# Altium PCB loadcell.PcbDoc
Units mm, origin at the board's own origin, x right, y up, seen from the top; angles counter-clockwise.
Board outline 108.33 x 80.65 mm, 2 copper layers (Top Layer, Bottom Layer); 10 components, 14 nets, 67 pads, 0 vias.
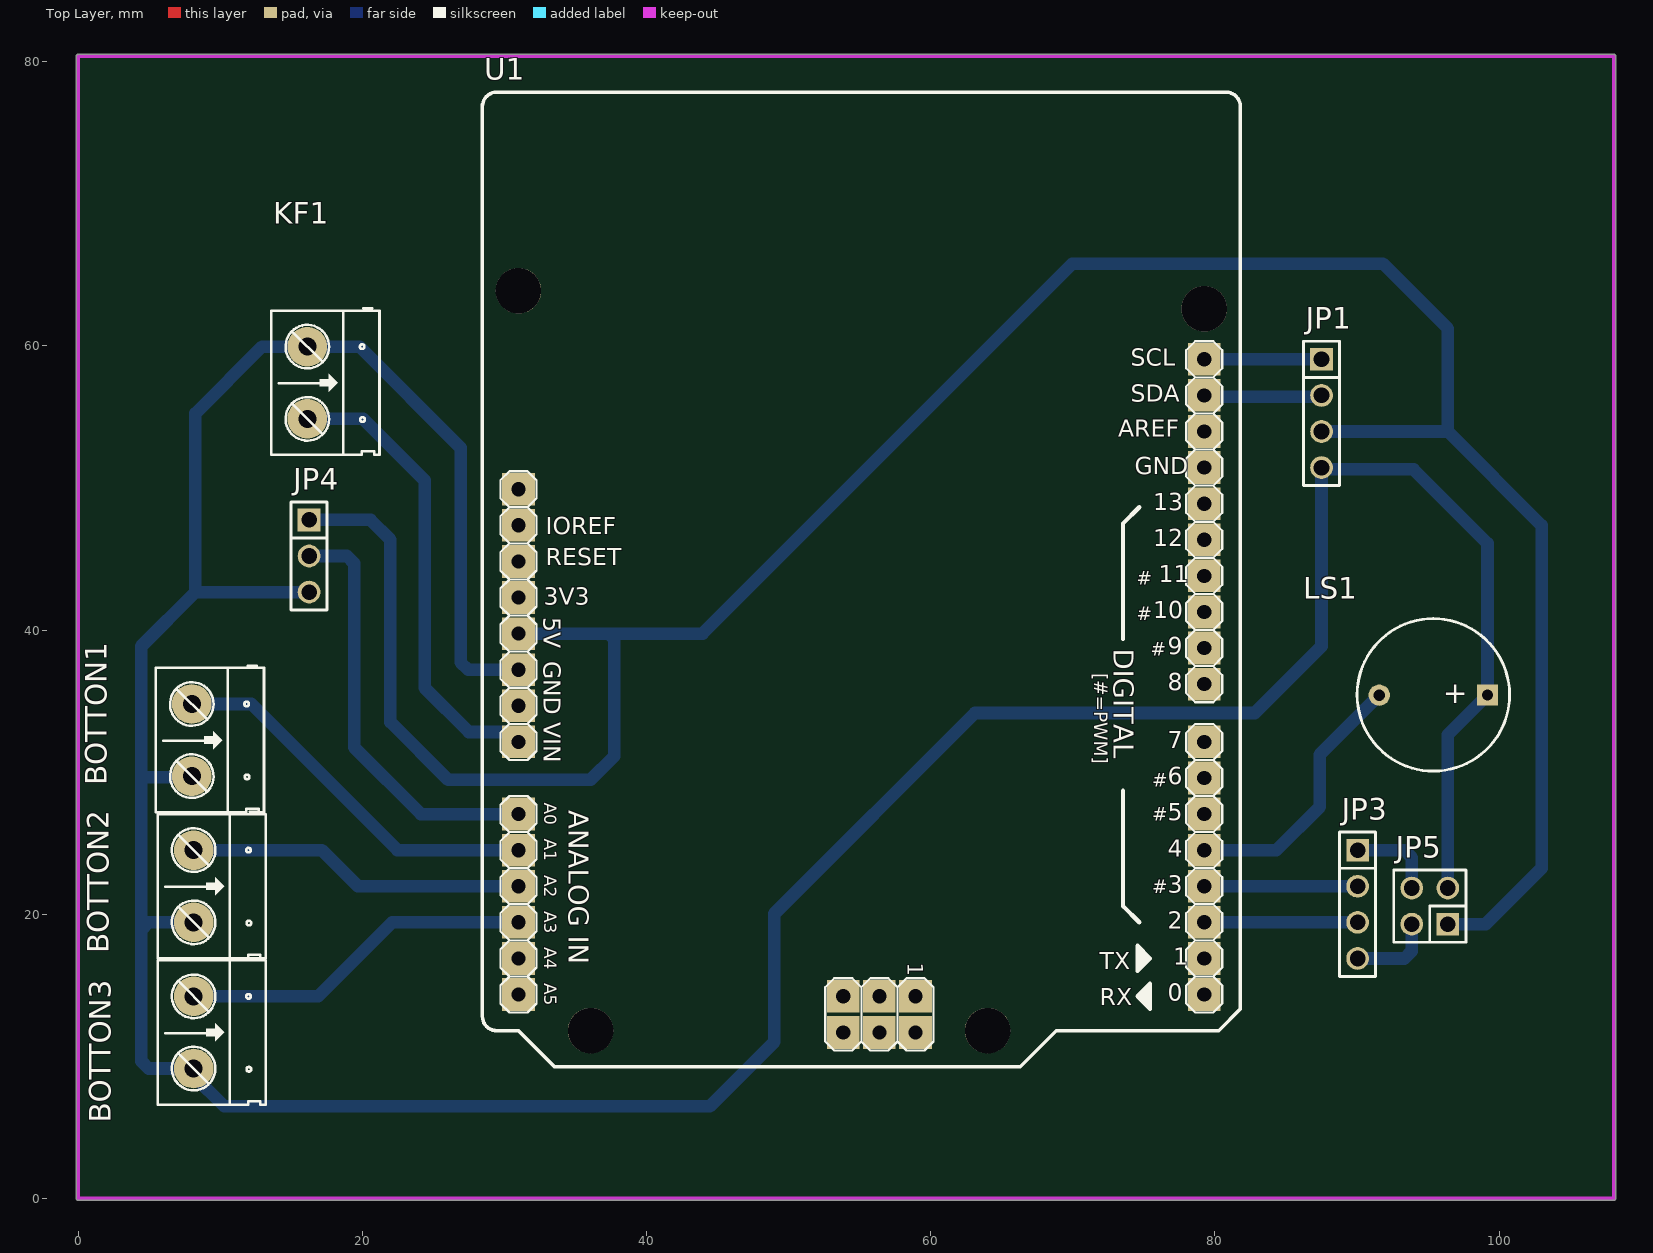
[diagram p0: Top Layer view]
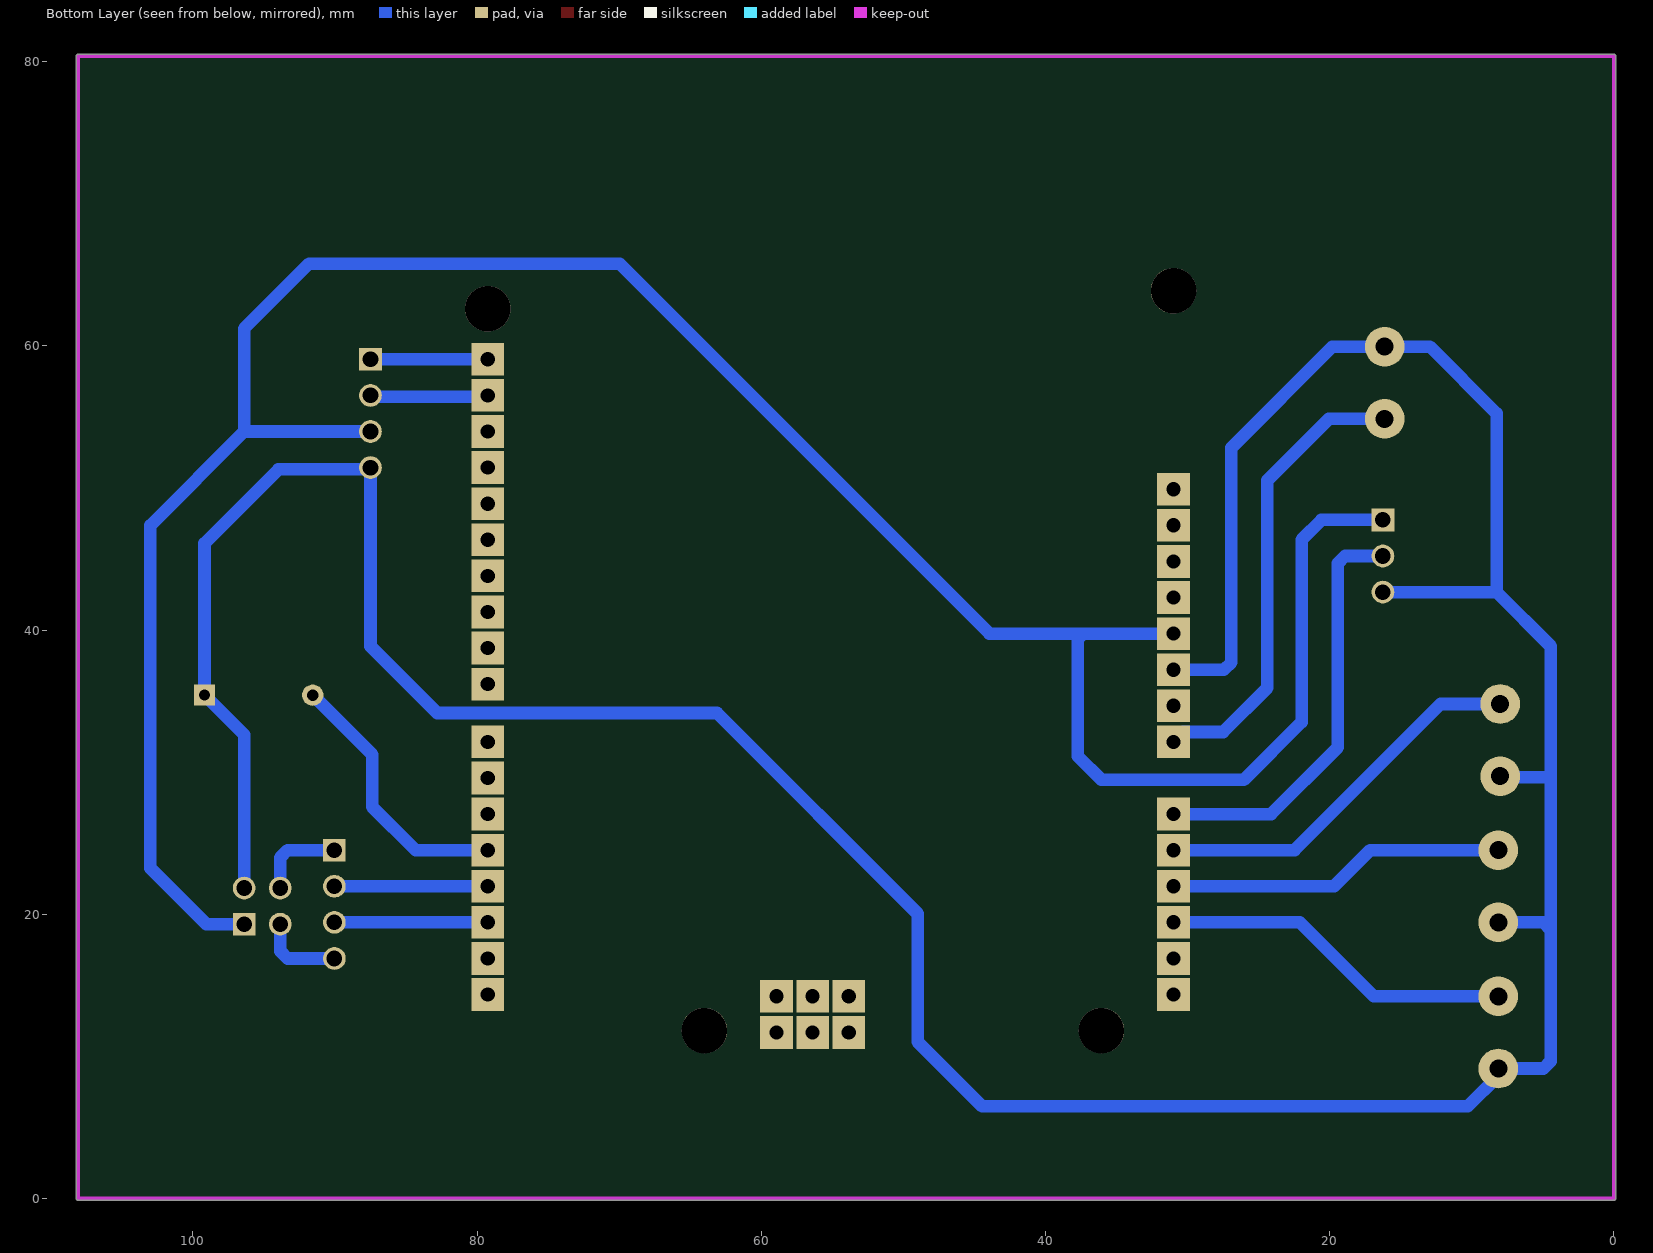
[diagram p1: Bottom Layer view, seen from below]
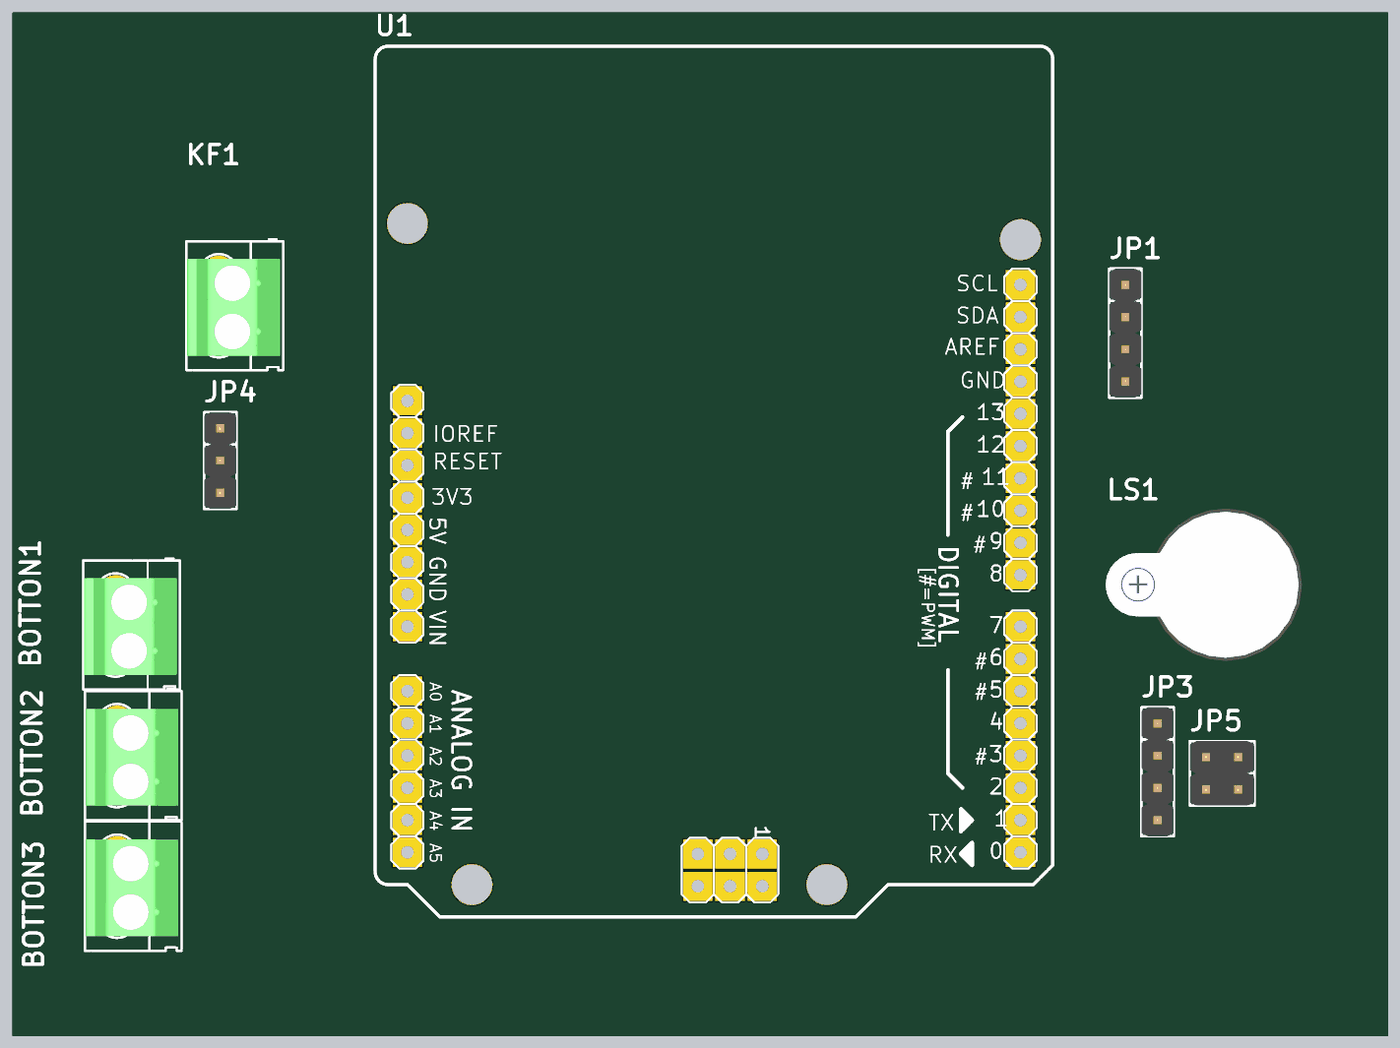
[diagram p2: 3D render of the assembled board from above, using the file's embedded part models]

## Layer stack, top to bottom
Top Solder: solder mask 0.0102, Solder Resist, Dk 3.5
Top Layer: signal copper 0.0356
Dielectric 1: dielectric 0.32, FR-4, Dk 4.8
Bottom Layer: signal copper 0.0356
Bottom Solder: solder mask 0.0102, Solder Resist, Dk 3.5

## Board outline
0,-0.127 cw(c0,0) -0.127,0 -0.127,80.391 cw(c0,80.391) 0,80.518 108.077,80.518 cw(c108.077,80.391) 108.204,80.391 108.204,0 cw(c108.077,0) 108.077,-0.127

## Design rules (kind name [scope] priority, off if disabled: settings)
Clearance [All] p1: gap=0.254 ignorepadtopadclearanceinfootprint=TRUE except(0: Arc-Hole Track-Hole SMDPad-Hole THPad-Hole Via-Hole Fill-Hole Poly-Hole Region-Hole Text-Hole; 0.508: Arc-Fill Arc-Poly Arc-Region Track-Fill Track-Poly Track-Region SMDPad-Fill SMDPad-Poly SMDPad-Region THPad-Fill THPad-Poly THPad-Region Fill-Fill Fill-Poly Fill-Region Poly-Poly Poly-Region Region-Region)
PolygonConnect [All] p1: connectstyle=Relief reliefconductorwidth=0.254 reliefentries=4 polygonreliefangle="90 Angle" airgapwidth=0.254
RoutingVias [All] p1: holewidth=0.711 width=1.27 viastyle="Through Hole" minholewidth=0.711 minwidth=1.27 maxholewidth=0.711 maxwidth=1.27
SolderMaskExpansion [All] p1: expansion=0.102 istentingtop=FALSE
Width [All] p1: maxlimit=0.889 minlimit=0.762 preferedwidth=0.889 minimp=50.000000 maximp=50.000000 favimp=50.000000
30 further rules are at their usual default settings.

## Components (designator, comment, footprint, x,y, rotation, side; value= is the part's Value field where it differs from the comment)
BOTTON1 "" "Con 2 KF301 5.08" 8.001,34.798 r270 top (schematic designator "BOTTON 1")
BOTTON2 "T" "Con 2 KF301 5.08" 8.128,24.511 r270 top
BOTTON3 "OTTON 3" "Con 2 KF301 5.08" 8.128,14.224 r270 top (schematic designator "BOTTON 3")
JP1 "LCD 1206" "JP 1x4 DT" 87.503,59.055 r270 top
JP3 "LoadCell HX711" "JP 1x4 DT" 90.043,24.511 r270 top
JP4 "Nhiệt độ" "JP 1x3 DT" 16.256,47.752 r270 top
JP5 "TU GOM VS TU HOA" "JP 2x2 DT" 95.123,20.574 r90 top
KF1 "CON 2 KF301" "Con 2 KF301 5.08" 16.129,59.944 r270 top
LS1 "Coi Chip Speaker" "Coi Chip Speacker" 99.187,35.433 r180 top
U1 "Arduino Uno" "Arduino Uno" 54.988,41.791 r270 top

## Footprints (in the part's own frame and the unit in brackets; to place one, negate y for a bottom-side part, rotate by r counter-clockwise, add the part's x,y. Pads: shape width x height; smd on the part's side, far side on the other; paste and mask are expansions set on the pad)
"Arduino Uno" [mm]
  rect 2.3x2.3 hole 1: 0(27.44,24.26) 1(24.9,24.26) 2(22.36,24.26) 3(19.82,24.26) 3V3(-0.5,-24) 4(17.28,24.26) 5(14.74,24.26) 5V(2.04,-24) 6(12.2,24.26) 7(9.66,24.26) 8(5.596,24.26) 9(3.056,24.26) 10(0.516,24.26) 11(-2.024,24.26) 12(-4.564,24.26) 13(-7.104,24.26) A0(14.74,-24) A1(17.28,-24) A2(19.82,-24) A3(22.36,-24) A4(24.9,-24) A5(27.44,-24) AREF(-12.184,24.26) GND1(4.58,-24) GND2(7.12,-24) GND3(-9.644,24.26) ICSP1(27.567,3.94) ICSP2(30.107,3.94) ICSP3(27.567,1.4) ICSP4(30.107,1.4) ICSP5(27.567,-1.14) ICSP6(30.107,-1.14) IOREF(-5.58,-24) NC(-8.12,-24) RESET(-3.04,-24) SCL(-17.264,24.26) SDA(-14.724,24.26) Vin(9.66,-24)
  round 3.2 hole 3.2: H1(-20.82,24.26) H2(-22.09,-24) H3(29.98,-18.92) H4(29.98,9.02)
  Bottom Layer lines w0.305: -14.47,24.26 -14.724,24.26
  silkscreen extent -36.06,-26.54 32.52,26.8
"Coi Chip Speacker" [mm]
  rect 1.5x1.5 hole 0.8: 1(0,0)
  round 1.5 hole 0.8: 2(7.62,0.013)
  silkscreen extent -1.55,-5.38 9.18,5.36, body extent -2.22,-6 13.24,6, height 4.5
"Con 2 KF301 5.08" [mil]
  round 110 hole 50: 1(0,0) 2(200,0)
  silkscreen extent -106,-100 300,200, body extent -45,-97 255,190, height 335
"JP 1x3 DT" [mm]
  rect 1.6x1.6 hole 1.1: 1(0,0)
  round 1.6 hole 1.1: 2(2.54,0) 3(5.08,0)
  silkscreen extent -1.27,-1.27 6.35,1.27, body extent -1.27,-1.27 6.35,1.27, height 8.54
"JP 1x4 DT" [mm] "4 pins, 1 row, straight, gold plating"
  rect 1.6x1.6 hole 1.1: 1(0,0)
  round 1.6 hole 1.1: 2(2.54,0) 3(5.08,0) 4(7.62,0)
  silkscreen extent -1.27,-1.27 8.89,1.27, body extent -1.27,-1.27 8.89,1.27, height 8.54
"JP 2x2 DT" [mm] "JP 2x2 DT"
  rect 1.6x1.6 hole 1.1: 1(-1.27,-1.27)
  round 1.6 hole 1.1: 2(1.27,-1.27) 3(1.27,1.27) 4(-1.27,1.27)
  silkscreen extent -2.54,-2.54 2.54,2.54, body extent -2.54,-2.54 2.54,2.54, height 8.55

## Part data
BOTTON1 BOTTON2 BOTTON3: library part "CON 2 KF301", "Cắm", Chung_Loai=Cắm, Don_Vi=Con, Ma_Hang=MH000987, Ten_Linh_Kien="CON 2 KF301-2P 5.08MM Xanh Dương"
JP1 JP3: library part "JP 1x4 2.54 Duc Thang", "Cắm", Chung_Loai=Cắm, Don_Vi=Con, Ma_Hang=MH000903, Ten_Linh_Kien="Jump Đơn Đực 2.54MM 1x40P Thẳng 11MM"
JP4: library part "JP 1x3 2.54 Duc Thang", "Cắm", Chung_Loai=Cắm, Don_Vi=Con, Ma_Hang=MH000903, Ten_Linh_Kien="Jump Đơn Đực 2.54MM 1x40P Thẳng 11MM"
JP5: library part "JP 2x2 2.54 Duc Thang", "Cắm", Chung_Loai=Cắm, Don_Vi=Con, Ma_Hang=MH002686, Ten_Linh_Kien="Jump Đôi Đực 2.54MM 2x40P Thẳng 11MM"
KF1: "Cắm", Chung_Loai=Cắm, Don_Vi=Con, Ma_Hang=MH000987, Ten_Linh_Kien="CON 2 KF301-2P 5.08MM Xanh Dương"
LS1: "Còi chip"

## Nets (pads, with @x,y where several pads share a name; then routed paths per layer and width w, separated by ;. In a path a pad name is that pad's centre, name@x,y a point inside that pad or via, vN(x,y) a via of type N, cw(c..) or ccw(c..) an arc to the next point about the centre after c; other vN are vias at no path point)
+5: JP1.3 JP4.1 JP5.1 U1.5V | length 181.9
  Bottom Layer w0.889: JP4.1 20.574,47.752 21.971,46.355 21.971,33.528 26.035,29.464 36.068,29.464 37.719,31.115 37.719,39.37 37.338,39.751 ; U1.5V 37.338,39.751 ; JP1.3 96.393,53.975 ; JP5.1 99.06,19.304 102.997,23.241 102.997,47.371 96.393,53.975 ; 37.338,39.751 43.942,39.751 69.977,65.786 91.821,65.786 96.393,61.214 96.393,53.975
GND: BOTTON1.2 BOTTON2.2 BOTTON3.2 JP1.4 JP4.3 JP5.2 KF1.1 LS1.1 U1.GND1 | length 261
  Bottom Layer w0.889: BOTTON2.2@8.001,19.304 BOTTON2.2 4.966,19.431 4.445,18.91 ; BOTTON1.2 7.936,29.653 4.445,29.653 ; JP4.3 8.255,42.672 ; U1.GND1 27.445,37.211 26.924,37.732 26.924,52.832 19.812,59.944 KF1.1 12.954,59.944 8.255,55.245 8.255,42.672 ; JP5.2 96.393,32.639 LS1.1 99.187,46.101 93.98,51.308 87.63,51.308 JP1.4 87.503,38.862 82.804,34.163 63.119,34.163 48.99,20.034 48.99,11.017 44.45,6.477 10.287,6.477 8.128,8.636 BOTTON3.2 4.966,9.144 4.445,9.665 4.445,18.91 ; 4.445,18.91 4.445,29.653 ; 4.445,29.653 4.445,38.862 8.255,42.672
NetBOTTON2_1: BOTTON2.1 U1.A2 | length 23.9
  Bottom Layer w0.889: BOTTON2.1 17.145,24.511 19.685,21.971 U1.A2
"NetBOTTON 1_1": BOTTON1.1 U1.A1 | length 27.2
  Bottom Layer w0.889: BOTTON1.1 12.192,34.798 22.479,24.511 U1.A1
"NetBOTTON 3_1": BOTTON3.1 U1.A3 | length 25
  Bottom Layer w0.889: BOTTON3.1 16.891,14.224 22.098,19.431 U1.A3
NetJP1_1: JP1.1 U1.SCL | length 8.3
  Bottom Layer w0.889: U1.SCL JP1.1
NetJP1_2: JP1.2 U1.SDA | length 8.3
  Bottom Layer w0.889: U1.SDA 79.335,56.428 87.416,56.428 JP1.2
NetJP3_1: JP3.1 JP5.3 | length 6.2
  Bottom Layer w0.889: JP3.1 93.332,24.511 93.853,23.99 JP5.3
NetJP3_2: JP3.2 U1.3 | length 10.8
  Bottom Layer w0.889: U1.3 JP3.2
NetJP3_3: JP3.3 U1.2 | length 10.8
  Bottom Layer w0.889: U1.2 JP3.3
NetJP3_4: JP3.4 JP5.4 | length 5.9
  Bottom Layer w0.889: JP3.4 93.332,16.891 93.853,17.412 JP5.4
NetJP4_2: JP4.2 U1.A0 | length 29.8
  Bottom Layer w0.889: JP4.2 18.91,45.212 19.431,44.691 19.431,31.75 24.13,27.051 U1.A0
NetLS1_2: LS1.2 U1.4 | length 19
  Bottom Layer w0.889: U1.4 84.328,24.511 87.376,27.559 87.376,31.229 LS1.2
VCC: KF1.2 U1.Vin | length 32.8
  Bottom Layer w0.889: KF1.2 20.066,54.864 24.384,50.546 24.384,35.941 27.503,32.822 30.297,32.822 U1.Vin
pads on no net: U1.0 U1.1 U1.3V3 U1.5 U1.6 U1.7 U1.8 U1.9 U1.10 U1.11 U1.12 U1.13 U1.A4 U1.A5 U1.AREF U1.GND2 U1.GND3 U1.H1 U1.H2 U1.H3 U1.H4 U1.ICSP1 U1.ICSP2 U1.ICSP3 U1.ICSP4 U1.ICSP5 U1.ICSP6 U1.IOREF U1.NC U1.RESET

## Keep-outs
Keep-Out Layer:
  lines w0.254: 0,0 108.077,0 108.077,80.391 0,80.391 0,0

## Text inside footprints (layer, text, board x,y; h text height)
LS1: Top Overlay "+" at 97.777,36.144 h1.52 r180
U1: Top Overlay "SDA" at 74.075,56.062 h1.21; Top Overlay "SCL" at 74.088,58.591 h1.21; Top Overlay "#" at 75.488,38.191 h0.95; Top Overlay "#" at 75.588,28.991 h0.95; Top Overlay "#" at 75.588,21.491 h0.95; Top Overlay "#" at 75.588,26.591 h0.95; Top Overlay "#" at 74.488,40.691 h0.95; Top Overlay "#" at 74.488,43.191 h0.95; Top Overlay "[#=PWM]" at 71.501,36.957 h0.95 r270; Top Overlay "0" at 76.664,13.904 h1.21; Top Overlay "1" at 77.067,16.444 h1.21; Top Overlay "2" at 76.664,18.984 h1.21; Top Overlay "3" at 76.664,21.524 h1.21; Top Overlay "4" at 76.664,24.064 h1.21; Top Overlay "5" at 76.664,26.604 h1.21; Top Overlay "6" at 76.664,29.144 h1.21; Top Overlay "7" at 76.664,31.684 h1.21; Top Overlay "8" at 76.664,35.748 h1.21; Top Overlay "9" at 76.664,38.288 h1.21; Top Overlay "10" at 75.657,40.828 h1.21; Top Overlay "11" at 76.06,43.368 h1.21; Top Overlay "12" at 75.657,45.908 h1.21; Top Overlay "13" at 75.657,48.448 h1.21; Top Overlay "RX" at 71.882,13.589 h1.21; Top Overlay "TX" at 71.907,16.129 h1.21; Top Overlay "DIGITAL" at 72.873,38.684 h1.42 r270; Top Overlay "IOREF" at 32.893,46.736 h1.21; Top Overlay "GND" at 32.766,37.821 h1.21 r270; Top Overlay "VIN" at 32.766,33.528 h1.21 r270; Top Overlay "A5" at 32.791,15.138 h0.86 r270; Top Overlay "A4" at 32.791,17.678 h0.86 r270; Top Overlay "A3" at 32.791,20.218 h0.86 r270; Top Overlay "A2" at 32.791,22.758 h0.86 r270; Top Overlay "A1" at 32.791,25.298 h0.86 r270; Top Overlay "3V3" at 32.766,41.783 h1.21; Top Overlay "RESET" at 32.893,44.577 h1.21; Top Overlay "GND" at 74.374,50.963 h1.21; Top Overlay "1" at 58.395,16.586 h1.08 r270; Top Overlay "AREF" at 73.191,53.605 h1.21; Top Overlay "ANALOG IN" at 34.544,27.305 h1.42 r270; Top Overlay "A0" at 32.791,27.838 h0.86 r270; Top Overlay "5V" at 32.766,40.894 h1.21 r270